# Altium PCB Nano_RP2040_Connect.PcbDoc (part 2 of 2)
Units mm, origin at the board's own origin, x right, y up, seen from the top; angles counter-clockwise.
Board outline 43.18 x 17.78 mm, 4 copper layers (TOP, GND, SIG, BOTTOM), stack 1.586 mm thick; 92 components, 78 nets, 388 pads, 198 vias.
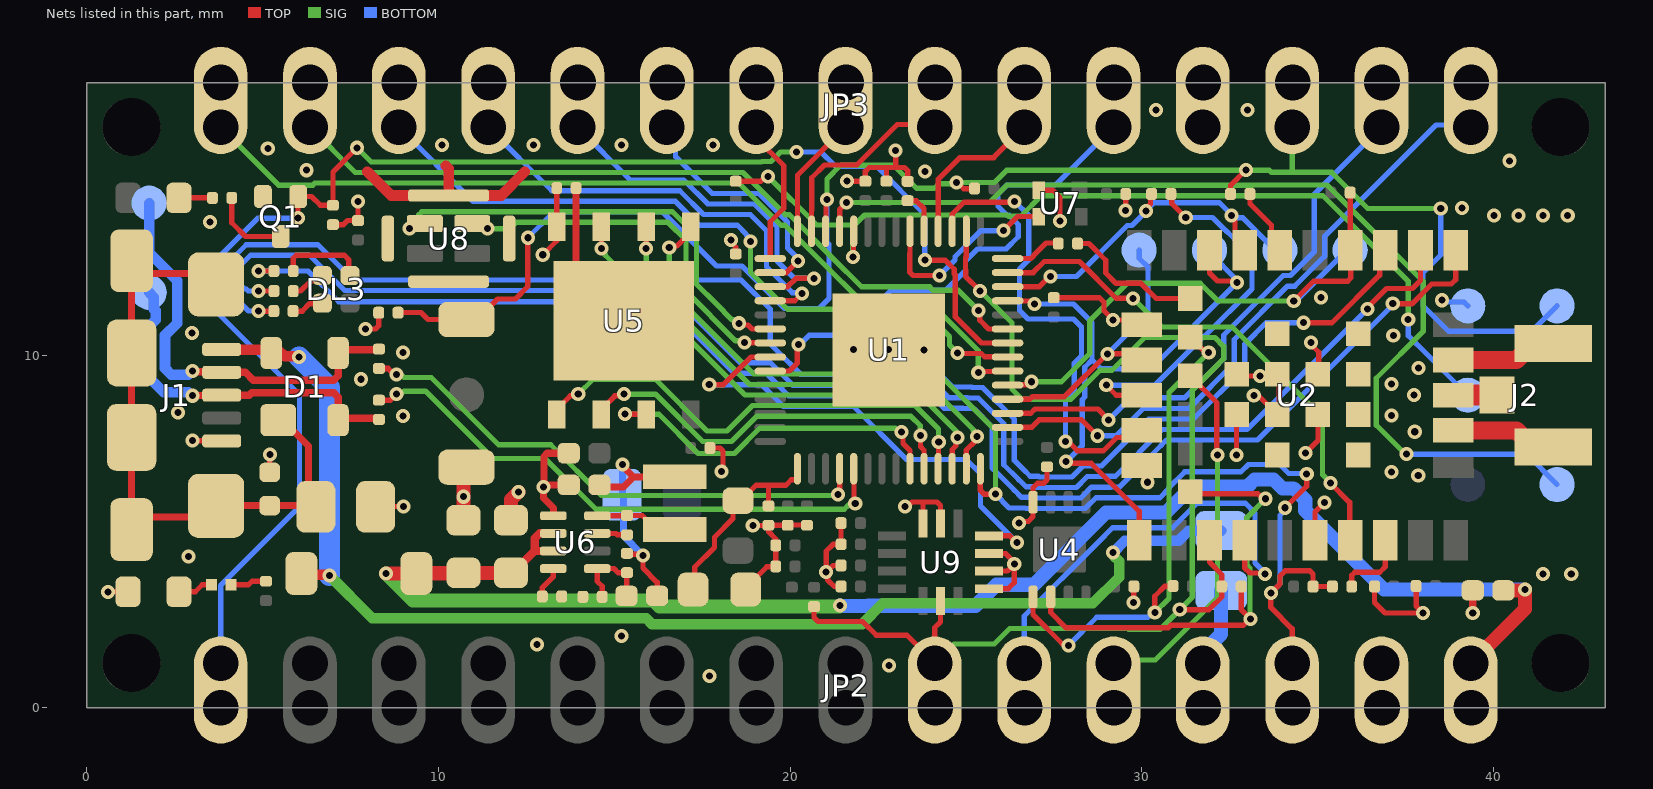
[diagram p4: the nets of this part, all layers, seen from the top]

## Via types
v1: diameter 0.4, hole 0.2, TOP to BOTTOM, tented both sides, 198 vias

## Nets (pads, with @x,y where several pads share a name; then routed paths per layer and width w, separated by ;. In a path a pad name is that pad's centre, name@x,y a point inside that pad or via, vN(x,y) a via of type N, cw(c..) or ccw(c..) an arc to the next point about the centre after c; other vN are vias at no path point) (continued)
A5/SCL~: JP2.9 R10.1 R17.1 U1.16 U2.3 U9.13 | length 37
  TOP w0.15: R10.1@20.676,2.871 20.676,2.563 20.792,2.447 22.055,2.447 22.446,2.055 23.315,2.055 JP2.9@24.109,1.261 24.109,2.271 24.269,2.431 U9.13@24.269,3.129 ; U1.16@25.004,13.541 25.004,12.817 24.981,12.794 24.981,12.442 24.987,12.436 24.987,12.257 v1(25.395,11.849) ; v1(31.074,2.784) 31.905,2.784 32.269,3.148 32.269,3.786 31.919,4.136 U2.3@31.919,4.756
  SIG w0.15: JP2.9@24.109,1.261 24.654,1.806 25.798,1.806 26.24,2.248 29.601,2.248 29.625,2.224 30.514,2.224 31.433,3.143 31.433,9.031 32.071,9.669 32.074,9.669 32.323,9.918 32.323,10.27 32.074,10.519 30.077,10.519 29.149,9.591 28.809,9.591 27.984,8.766 26.587,8.766 26.304,9.049 26.304,10.942 25.397,11.849 v1(25.395,11.849)
A6: JP2.10 U2.4 | length 12.6
  TOP w0.15: U2.4@32.919,4.756 32.919,3.973 33.068,3.824 33.46,3.824 v1(33.493,3.791)
  BOTTOM w0.15: JP2.10@26.649,1.261 26.649,2.596 28.733,4.68 29.169,5.116 30.874,5.116 31.57,5.812 32.934,5.812 33.212,5.534 33.212,4.112 33.493,3.831 v1(33.493,3.791)
A7: JP2.11 U2.34 | length 10.4
  TOP w0.15: U2.34@31.369,9.431 32.124,8.676 32.124,7.197 v1(32.142,7.18)
  SIG w0.15: JP2.11@29.189,1.261 29.281,1.353 30.376,1.353 32.144,3.121 32.144,7.177 v1(32.142,7.18)
ANT: J2.SIG U2.13 | length 1.3
  TOP w0.6: U2.13@38.844,8.881 J2.SIG@40.094,8.881
D2~: JP3.5 U1.37 | length 14.6
  TOP w0.15: U1.37@19.429,9.566 19.973,9.566 20.201,9.795 20.201,10.294 v1(20.234,10.326)
  BOTTOM w0.15: v1(20.234,10.326) 20.278,10.326 20.535,10.583 21.579,10.583 22.857,11.861 24.415,11.861 24.981,12.427 24.981,12.695 25.326,13.04 26.138,13.04 26.483,13.385 26.483,13.737 26.225,13.995 26.167,13.995 25.908,14.253 25.908,14.606 26.157,14.855 27.542,14.855 JP3.5@29.189,16.501
D3~: JP3.6 U1.18 | length 4.5
  TOP w0.15: U1.18@24.204,13.541 24.204,15.019 24.82,15.635 25.783,15.635 JP3.6@26.649,16.501
D4~: JP3.7 U1.27 | length 5.7
  TOP w0.15: U1.27@20.604,13.541 20.604,14.129 20.61,14.134 20.61,15.064 20.971,15.425 21.889,15.425 23.04,16.576 24.034,16.576 JP3.7@24.109,16.501
D5~: JP3.8 U1.28 | length 3.5
  TOP w0.15: U1.28@20.204,13.541 20.204,14.331 20.207,14.334 20.207,14.766 20.204,14.769 20.204,15.136 JP3.8@21.569,16.501
D6~: JP3.9 U1.29 | length 4.2
  TOP w0.15: JP3.9@19.029,16.501 19.029,16.193 19.813,15.409 19.813,14.195 19.429,13.812 U1.29@19.429,12.766
D7~: JP3.10 U1.30 | length 7.1
  TOP w0.15: U1.30@19.429,12.366 19.894,12.366 v1(20.224,12.696)
  BOTTOM w0.15: JP3.10@16.489,16.501 16.734,16.257 16.734,15.664 17.782,14.616 19.11,14.616 19.921,13.806 19.921,13.07 20.109,12.882 20.109,12.879 20.224,12.764 v1(20.224,12.696)
D8~: JP3.11 U1.31 | length 10.4
  TOP w0.15: U1.31@19.429,11.966 19.926,11.966 20.162,12.202 v1(20.679,12.202)
  BOTTOM w0.15: JP3.11@13.949,16.501 15.457,14.993 16.98,14.993 17.657,14.316 18.986,14.316 19.621,13.681 19.621,12.697 20.104,12.215 20.666,12.215 v1(20.679,12.202)
D9~: JP3.12 U1.32 | length 12.5
  TOP w0.15: U1.32@19.439,11.576 U1.32@19.429,11.566 20.127,11.566 v1(20.334,11.773)
  BOTTOM w0.15: JP3.12@11.409,16.501 13.217,14.693 16.856,14.693 17.533,14.016 18.862,14.016 19.321,13.557 19.321,12.532 20.059,11.794 20.312,11.794 v1(20.334,11.773)
D10~: JP3.13 U1.7 | length 20.7
  TOP w0.15: v1(24.754,10.086) 24.774,10.066 25.431,10.066 25.521,9.976 26.17,9.976 U1.7@26.179,9.966
  SIG w0.15: v1(18.87,13.253) 18.87,12.377 19.921,11.327 23.749,11.327 24.529,10.546 24.529,10.311 v1(24.754,10.086)
  BOTTOM w0.15: JP3.13@8.869,16.501 10.977,14.393 16.732,14.393 17.409,13.716 18.491,13.716 18.74,13.468 18.74,13.451 18.87,13.32 v1(18.87,13.253)
D_N: R4.2 U1.46 | length 15.3
  TOP w0.15: v1(21.357,6.063) 21.404,6.111 U1.46@21.404,6.791
  TOP w0.16: R4.2@8.304,9.641 8.564,9.641 8.739,9.466 v1(8.804,9.466)
  SIG w0.15: v1(8.804,9.466) 8.852,9.419 8.985,9.419 9.017,9.386 9.793,9.386 11.706,7.473 13.191,7.473 14.637,6.028 21.322,6.028 v1(21.357,6.063)
D_P: R5.2 U1.47 | length 16.1
  TOP w0.15: U1.47@21.804,6.791 21.814,6.782 21.814,5.831 v1(21.847,5.798)
  TOP w0.16: R5.2@8.304,8.741 8.629,8.741 v1(8.804,8.916)
  SIG w0.15: v1(8.804,8.916) 8.852,8.964 8.985,8.964 9.017,8.996 9.632,8.996 11.545,7.083 13.03,7.083 14.475,5.638 21.533,5.638 21.645,5.75 21.799,5.75 v1(21.847,5.798)
GND: C1.1 C2.2 C3.1 C4.1 C5.2 C6.2 C7.2 C8.2 C9.1 C10.2 C11.2 C12.2 C13.2 C14.2 C15.2 C16.2 C17.1 C18.2 C21.2 C22.1 C23.1 C24.2 C25.1 C26.2 C27.2 C28.2 C30.2 C32.2 C33.1 DL1.C J1.5 J2.GND JP2.14 JP3.4 PB1.1 Q1.S R1.1 R3.2 R8.1 R23.1 RPAD.2 TP_GND.X U1.57 U2.6 U2.12 U2.14 U2.26 U2.30 U2.GND1 U2.GND2 U2.GND3 U2.GND4 U2.GND5 U2.GND6 U2.GND7 U2.GND8 U2.GND9 U2.GND10 U2.GND11 U2.GND12 U4.4 U5.4 U6.1 U7.2 U8.5 U9.1 U9.2 U9.3 U9.6 U9.7 | length 60.6
  TOP w0.15: v1(0.604,3.291) DL1.C@1.169,3.291 ; v1(3.004,7.591) 3.009,7.586 3.829,7.586 J1.5@3.834,7.581 ; R1.1@5.201,6.689 5.203,6.691 5.203,7.19 v1(5.204,7.191) ; R23.1@6.996,13.731 7.299,13.731 7.414,13.846 C28.2@7.711,13.846 v1(7.711,14.392) ; v1(7.921,10.762) 8.202,10.762 8.298,10.857 C2.2@8.298,11.226 ; C1.1@8.21,5.706 8.22,5.716 v1(9.004,5.716) ; v1(12.962,12.875) 12.965,12.875 13.361,13.271 RPAD.2@13.361,14.771 ; C26.2@17.721,7.381 17.999,7.381 18.086,7.293 18.086,6.759 v1(18.04,6.712) ; v1(18.315,13.291) 18.315,13.224 18.45,13.088 C21.2@18.45,12.9 ; C9.1@18.735,3.355 18.735,3.405 19.33,4.001 19.574,4.001 C24.2@19.587,4.014 C33.1@19.587,4.614 19.587,4.795 19.38,5.002 C8.2@19.38,5.182 ; v1(18.934,5.173) 18.939,5.178 19.375,5.178 C8.2@19.38,5.182 ; C13.2@20.476,5.182 20.467,5.191 19.937,5.191 C18.2@19.928,5.182 19.923,5.187 19.384,5.187 C8.2@19.38,5.182 ; v1(21.015,3.851) 21.063,3.803 21.063,3.629 21.25,3.443 C32.2@21.445,3.443 ; C30.2@21.445,4.043 21.443,4.041 21.214,4.041 21.046,3.873 21.038,3.873 21.023,3.887 21.023,4.449 21.215,4.641 21.442,4.641 C6.2@21.445,4.643 ; C6.2@21.445,4.651 C5.2@21.445,5.243 ; v1(21.611,14.966) C10.2@22.134,14.966 22.134,15.246 22.246,15.358 22.748,15.358 ; C11.2@22.734,14.966 22.734,15.343 22.748,15.358 ; v1(22.994,15.843) 22.999,15.839 22.999,15.358 ; v1(23.267,5.719) 23.335,5.719 23.461,5.845 23.771,5.845 ; R3.2@23.338,14.962 23.338,15.27 23.25,15.358 22.999,15.358 ; U9.7@23.771,5.331 23.771,5.845 ; U9.6@24.271,5.331 24.271,5.74 24.166,5.845 23.771,5.845 ; U9.1@25.646,3.381 26.198,3.381 26.369,3.552 v1(26.369,4.079) ; U9.2@25.646,3.881 26.171,3.881 v1(26.369,4.079) ; U9.3@25.646,4.381 26.123,4.381 26.369,4.135 v1(26.369,4.079) ; v1(26.503,5.252) 26.543,5.291 26.766,5.291 26.904,5.429 U4.4@26.904,5.836 ; U4.4@26.869,5.916 26.904,5.952 26.904,6.25 27.036,6.381 27.211,6.381 27.299,6.469 C12.2@27.299,6.847 ; U7.2@27.067,14.708 27.467,14.708 27.672,14.503 v1(27.672,13.833) ; C7.2@27.491,11.654 28.305,11.654 28.786,11.654 28.917,11.523 28.917,11.281 v1(29.177,11.021) 29.855,11.021 U2.26@29.994,10.881 ; v1(29.536,14.129) 29.538,14.131 29.538,14.59 C14.2@29.539,14.591 ; v1(29.763,2.993) 29.766,2.996 29.766,3.439 C27.2@29.769,3.442 ; U2.30@29.994,6.881 30.151,6.724 v1(30.151,6.407) ; v1(32.692,7.18) 32.69,7.182 32.69,8.322 U2.GND11@32.699,8.332 ; U2.GND12@32.699,9.481 32.752,9.429 v1(33.357,9.429) ; v1(33.178,8.871) 33.226,8.824 33.357,8.824 U2.GND8@33.849,8.332 33.904,8.387 33.904,9.426 U2.GND9@33.849,9.481 ; v1(34.654,7.241) 35.004,7.591 35.004,8.327 U2.GND5@34.999,8.332 ; v1(34.81,10.386) 34.81,10.318 35.025,10.103 35.025,9.507 U2.GND6@34.999,9.481 ; U2.6@34.919,4.756 34.919,5.557 v1(35.193,5.83) ; C15.2@36.613,3.442 36.613,2.987 36.909,2.691 v1(37.984,2.691) 37.984,2.7 37.794,2.89 C16.2@37.794,3.453 ; 22.748,15.358 22.999,15.358
  TOP w0.2: v1@12.996,6.243 12.996,7.143 13.084,7.231 C17.1@13.701,7.231 ; U6.1@13.263,5.451 13.263,5.676 12.98,5.959 v1(12.98,6.266) 13.034,6.266 13.099,6.331 C3.1@13.701,6.331 ; v1(39.404,2.691) C25.1@39.404,3.291
  TOP w0.3: 7.978,15.231 8.65,14.559 U8.5@10.284,14.559 ; 10.2,15.4 10.284,15.316 U8.5@10.284,14.559 ; 12.45,15.231 11.778,14.559 U8.5@10.284,14.559
  TOP w0.4: C23.1@10.708,5.328 v1(10.708,5.995) 10.708,6.747 PB1.1@10.794,6.833 ; C4.1@12.058,5.328 12.058,5.918 v1(12.271,6.131)
  TOP w0.508: U2.12@38.844,7.881 40.644,7.881 41.119,7.406 J2.GND@41.694,7.406 ; U2.14@38.844,9.881 40.644,9.881 41.119,10.356 J2.GND@41.694,10.356
  BOTTOM w0.15: v1(38.526,11.581) 38.574,11.534 39.151,11.534 TP_GND.X@39.263,11.421
  other v1: 17.704,0.891 22.804,1.191 12.804,1.791 15.204,2.039 41.404,3.791 42.204,3.791 2.894,4.296 37.854,6.601 37.1,6.7 37.755,7.842 8.994,8.291 37.1,8.3 2.594,8.391 37.729,8.891 37.1,9.2 7.794,9.335 37.862,9.658 8.994,10.091 21.795,10.176 22.795,10.176 23.804,10.166 37.144,10.581 2.993,10.645 35.093,11.653 3.5,13.8 40.004,13.991 40.704,13.991 41.404,13.991 42.104,13.991 39.1,14.2 23.835,15.245 6.244,15.278 40.454,15.546 5.144,15.896 10.1,16 12.7,16 15.2,16 17.8,16 30.404,16.991 33.004,16.991
GPIO0: TP_GPIO0.X U1.4 U2.27 | length 8
  TOP w0.15: U1.4@26.179,8.766 26.814,8.766 26.887,8.839 27.795,8.839 v1(29.014,10.057) 29.819,10.057 U2.27@29.994,9.881
  BOTTOM w0.15: v1(29.014,10.057) 30.174,11.217 30.174,12.522 29.919,12.776 TP_GPIO0.X@29.919,13.006
INT1: U1.36 U9.4 | length 14.1
  TOP w0.15: v1(17.696,9.181) 18.101,9.181 18.887,9.966 U1.36@19.429,9.966 ; U9.4@25.646,4.881 26.244,4.881 26.433,4.693 v1(26.445,4.693)
  BOTTOM w0.15: v1(17.696,9.181) 19.185,9.181 19.8,8.567 21.789,8.567 23.301,7.056 25.004,7.056 25.409,6.651 25.409,5.729 v1(26.445,4.693)
LEDB: R13.2 U2.17 | length 42
  TOP w0.15: v1(4.878,11.841) R13.2@5.319,11.841 ; v1(36.411,11.332) 36.411,11.371 36.954,11.914 37.686,11.914 37.919,12.147 U2.17@37.919,13.006
  BOTTOM w0.15: v1(4.878,11.841) 4.591,11.841 4.533,11.9 4.482,11.9 4.346,12.036 4.346,12.551 4.655,12.859 6.329,12.859 7.331,11.857 16.523,11.857 18.573,9.807 19.43,9.807 20.071,9.167 24.14,9.167 24.494,8.812 25.033,8.812 25.045,8.8 25.345,8.8 26.071,8.074 26.071,6.904 26.496,6.479 ; 26.497,6.479 26.699,6.277 26.928,6.277 26.947,6.257 28.135,6.257 28.445,6.566 28.978,6.566 28.984,6.573 29.24,6.573 30.571,7.905 32.984,7.905 v1(36.411,11.332)
LEDG: R14.2 U2.16 | length 41.2
  TOP w0.15: v1(4.878,12.412) R14.2@5.319,12.412 ; v1(37.13,11.489) 37.14,11.479 37.675,11.479 38.238,12.041 38.794,12.041 38.919,12.166 U2.16@38.919,13.006
  BOTTOM w0.15: v1(4.878,12.412) 6.242,12.412 ; 6.292,12.412 7.164,11.54 16.365,11.54 18.399,9.507 19.306,9.507 19.947,8.867 24.015,8.867 24.37,8.512 24.909,8.512 24.921,8.5 25.22,8.5 25.736,7.985 25.736,6.816 25.771,6.781 ; 25.771,6.78 26.372,6.179 ; 26.373,6.179 26.575,5.977 26.804,5.977 26.823,5.957 28.26,5.957 28.569,6.266 29.102,6.266 29.109,6.273 29.364,6.273 30.548,7.457 30.696,7.605 33.285,7.605 37.13,11.449 v1(37.13,11.489)
LEDR: R15.2 U2.18 | length 42.8
  TOP w0.15: v1(4.874,11.271) R15.2@5.316,11.271 ; v1(34.594,10.942) 35.405,10.942 36.757,12.294 36.757,12.844 U2.18@36.919,13.006
  BOTTOM w0.15: v1(4.874,11.271) 4.869,11.277 4.599,11.277 4.019,11.857 4.019,12.647 4.531,13.159 6.572,13.159 7.574,12.157 18.603,12.157 19.429,11.33 19.429,10.337 19.63,10.137 20.3,9.467 24.264,9.467 24.619,9.112 25.157,9.112 25.169,9.1 25.469,9.1 26.371,8.198 26.371,7.028 26.62,6.779 ; 26.621,6.779 26.824,6.577 27.052,6.577 27.072,6.557 28.011,6.557 28.32,6.866 28.853,6.866 30.192,8.205 31.458,8.205 32.924,9.671 32.924,10.335 33.531,10.941 v1(34.594,10.942)
NetC1_2: C1.2 D1.1 J1.M1 J1.M2 J1.M3 J1.M4 J1.M5 J1.M6 R1.2 | length 18.9
  TOP w0.2: J1.M1@3.674,12.029 3.364,12.339 1.636,12.339 J1.M2@1.274,12.701 J1.M3@1.274,5.061 1.636,5.423 3.364,5.423 3.68,5.739 6.477,5.739 C1.2@6.51,5.706 6.305,5.912 6.305,7.439 5.492,8.251 D1.1@5.442,8.251
NetC3_2: C3.2 C20.2 L2.2 R6.2 SJ4.2 | length 7.4
  TOP w0.15: v1@15.227,6.877 v1(15.227,6.905) ; R6.2@15.358,4.384 15.386,4.356 15.782,4.356 v1(15.81,4.329) 15.81,3.965 16.215,3.561 C20.2@16.215,3.176
  TOP w0.2: C3.2@14.571,6.331 14.627,6.275 15.26,6.275 15.544,6.559 ; v1@15.227,6.877 15.544,6.559 ; L2.2@16.771,6.531 16.743,6.559 15.544,6.559
  BOTTOM w0.2: v1(15.227,6.905) 15.227,6.058 SJ4.2@15.221,6.052 15.255,6.019 15.255,4.884 v1(15.81,4.329)
NetC8_1: C8.1 C9.2 L1.1 U1.43 | length 5.9
  TOP w0.15: C9.2@17.235,3.355 17.283,3.403 17.283,3.994 17.843,4.555 17.843,4.844 18.371,5.371 18.371,5.713 18.551,5.894 18.603,5.894 19.03,6.32 19.39,6.32 ; C8.1@19.38,5.702 19.38,6.309 19.39,6.32 ; U1.43@20.204,6.791 20.204,6.499 20.181,6.476 20.029,6.476 19.874,6.32 19.39,6.32
NetC19_1: C19.1 L2.1 U6.8 | length 2.4
  TOP w0.15: U6.8@14.513,5.451 14.518,5.456 15.353,5.456 C19.1@15.358,5.461 15.791,5.461 16.221,5.031 L2.1@16.771,5.031
NetC19_2: C19.2 U6.7 | length 0.9
  TOP w0.15: U6.7@14.513,4.951 15.043,4.951 15.083,4.911 C19.2@15.358,4.911
NetC20_1: C20.1 R6.1 R8.2 U6.5 | length 2.4
  TOP w0.15: R8.2@14.652,3.149 14.652,3.45 14.513,3.59 U6.5@14.513,3.951 14.99,3.951 15.106,3.834 R6.1@15.358,3.834 15.351,3.828 15.351,3.183 C20.1@15.345,3.176
NetC22_2: C22.2 U6.4 | length 0.9
  TOP w0.15: C22.2@12.95,3.16 12.95,3.41 13.263,3.723 U6.4@13.263,3.951
NetDL1_A: DL1.A SJ2.1 | length 1
  TOP w0.15: DL1.A@2.619,3.291 3.081,3.291 3.281,3.491 SJ2.1@3.544,3.491
NetDL2_C: DL2.C R25.1 | length 0.9
  TOP w0.15: DL2.C@2.619,14.491 R25.1@3.569,14.491
NetDL3_2: DL3.2 R15.1 | length 0.8
  TOP w0.15: R15.1@5.916,11.271 6.123,11.271 6.336,11.484 6.632,11.484 DL3.2@6.644,11.496
NetDL3_3: DL3.3 R13.1 | length 1
  TOP w0.15: R13.1@5.919,11.841 6.077,11.841 6.367,12.132 6.54,12.132 DL3.3@6.694,12.286
NetDL3_4: DL3.4 R14.1 | length 2.5
  TOP w0.15: R14.1@5.869,12.412 5.866,12.415 5.866,12.771 5.954,12.859 7.327,12.859 7.444,12.741 DL3.4@7.444,12.296
NetJP2_12: JP2.12 SJ1.2 | length 2.3
  BOTTOM w0.4: JP2.12@31.729,1.261 31.729,1.566 32.252,2.089 SJ1.2@32.252,3.332
NetQ1_D: Q1.D R25.2 | length 2.3
  TOP w0.15: R25.2@4.119,14.491 4.119,13.783 4.511,13.391 Q1.D@5.508,13.391
NetR2_1: R2.1 SJ2.2 | length 1
  TOP w0.15: SJ2.2@4.144,3.491 4.599,3.491 4.702,3.594 5.091,3.594 R2.1@5.094,3.591
NetR3_1: R3.1 U1.19 | length 1.2
  TOP w0.15: R3.1@23.338,14.412 23.58,14.412 23.804,14.187 U1.19@23.804,13.541
NetR18_2: R18.2 U2.36 | length 4.1
  TOP w0.15: R18.2@28.169,13.191 28.494,13.191 28.969,12.717 28.969,12.357 29.265,12.061 29.975,12.061 30.404,11.632 U2.36@31.369,11.632
NetR20_1: R20.1 U2.8 | length 2.1
  TOP w0.15: R20.1@35.963,3.442 35.963,3.758 36.051,3.846 36.759,3.846 36.919,4.006 U2.8@36.919,4.756
NetR22_1: R22.1 U2.28 | length 10.7
  TOP w0.15: v1@28.964,9.145 v1(28.985,9.166) 29.269,8.881 U2.28@29.994,8.881 ; R22.1@30.821,14.587 R22.1@30.821,14.708 ; R22.1@30.821,14.59 R22.1@30.821,14.602 30.845,14.578 30.845,14.33 v1(31.244,13.931)
  BOTTOM w0.15: v1(28.985,9.166) 30.368,9.166 31.762,10.56 31.784,10.56 33.129,11.905 33.129,12.807 32.437,13.513 ccw(c31.919,13.006) 32.342,13.595 32.004,13.931 v1(31.244,13.931)
NetR28_1: R28.1 U2.21 | length 1.9
  TOP w0.15: R28.1@33.069,14.602 33.069,14.324 33.681,13.712 33.681,13.244 U2.21@33.919,13.006
NetRPAD_1: RPAD.1 U5.9 | length 4.3
  TOP w0.2: RPAD.1@13.911,14.771 13.911,12.356 U5.9@15.266,11.001
NetU1_20: U1.20 U7.3 | length 5.6
  TOP w0.15: U1.20@23.404,13.541 23.404,12.91 23.399,12.905 23.399,12.374 23.487,12.286 v1(24.239,12.286) ; v1(26.058,13.561) 26.459,13.962 27.063,13.962 U7.3@27.067,13.958
  BOTTOM w0.15: v1(24.239,12.286) 24.681,12.728 24.681,12.819 25.423,13.561 v1(26.058,13.561)
PDMCLK: U1.35 U8.3 | length 10.9
  TOP w0.15: U8.3@10.959,13.759 11.242,13.759 v1(11.387,13.615) ; v1(18.697,10.378) 18.702,10.372 19.423,10.372 U1.35@19.429,10.366
  SIG w0.15: v1(11.387,13.615) 12.024,13.615 12.205,13.796 16.526,13.796 17.034,13.288 17.034,11.839 18.447,10.426 18.649,10.426 v1(18.697,10.378)
PDMDIN: U1.34 U8.4 | length 13.2
  TOP w0.15: v1(9.177,13.616) 9.466,13.616 U8.4@9.609,13.759 ; v1(18.548,10.926) 18.596,10.878 18.798,10.878 18.909,10.766 U1.34@19.429,10.766
  SIG w0.15: v1(9.177,13.616) 9.437,13.876 9.437,14.008 9.525,14.096 16.65,14.096 17.334,13.412 17.334,12.035 17.883,11.485 18.345,11.024 18.382,11.024 18.48,10.926 v1(18.548,10.926)
QSPI_CSn: JP2.13 R19.1 R20.2 U1.56 U5.1 | length 34.2
  TOP w0.15: v1(16.559,13.077) 16.606,13.125 16.775,13.125 17.172,13.521 U5.1@17.171,13.671 ; U1.56@25.404,6.791 25.404,6.173 25.511,6.067 v1(25.834,6.067) ; v1(34.071,5.682) 34.684,6.294 v1(34.684,6.644) ; JP2.13@34.269,1.261 34.269,2.237 33.664,2.842 v1(33.664,3.254) 33.924,3.514 33.924,3.739 34.072,3.887 34.775,3.887 34.863,3.799 R19.1@34.863,3.442 R20.2@35.413,3.442
  SIG w0.15: v1(16.559,13.077) 16.559,11.89 18.963,9.486 24.222,9.486 25.736,7.972 25.834,7.875 v1(25.834,6.067)
  BOTTOM w0.15: v1(25.834,6.067) 26.224,5.677 26.679,5.677 26.699,5.657 28.384,5.657 28.693,5.966 30.509,5.966 30.758,6.215 30.758,6.244 31.217,6.704 32.816,6.704 33.025,6.912 33.916,6.912 34.171,6.657 34.671,6.657 v1(34.684,6.644) ; v1(33.664,3.254) 33.924,3.515 33.924,5.469 34.071,5.616 v1(34.071,5.682)
QSPI_SCK: U1.52 U5.6 | length 11.6
  TOP w0.15: U5.6@14.631,8.331 14.631,8.481 15.013,8.863 15.223,8.863 v1(15.271,8.911) ; v1(23.702,7.741) 23.702,7.418 23.804,7.316 U1.52@23.804,6.791
  SIG w0.15: v1(15.271,8.911) 16.167,8.911 17.513,7.565 18.327,7.565 19.042,8.28 23.43,8.28 23.694,8.016 23.694,7.749 v1(23.702,7.741)
QSPI_SD0: U1.53 U5.5 | length 13.7
  TOP w0.15: U5.5@13.361,8.331 13.362,8.481 13.743,8.863 13.924,8.863 v1(13.972,8.911) ; U1.53@24.204,6.791 24.213,6.8 24.213,7.547 v1(24.222,7.556)
  SIG w0.15: v1(13.972,8.911) 14.397,9.336 16.166,9.336 17.637,7.865 18.202,7.865 18.924,8.586 23.548,8.586 24.213,7.921 24.213,7.564 v1(24.222,7.556)
QSPI_SD1: U1.55 U5.2 | length 13.9
  TOP w0.15: v1(15.902,13.051) U5.2@15.901,13.671 ; U1.55@25.004,6.791 25.004,7.32 25.263,7.578 25.263,7.662 v1(25.311,7.71)
  SIG w0.15: v1(15.902,13.051) 15.902,12.123 18.839,9.186 23.921,9.186 25.203,7.904 25.203,7.885 25.311,7.778 v1(25.311,7.71)
QSPI_SD2: U1.54 U5.3 | length 14.1
  TOP w0.15: v1(14.632,13.051) U5.3@14.631,13.671 ; U1.54@24.604,6.791 24.604,7.337 24.704,7.437 24.704,7.444 24.711,7.45 24.711,7.627 v1(24.759,7.675)
  SIG w0.15: v1(14.632,13.051) 14.632,12.983 14.741,12.874 14.741,12.859 18.714,8.886 23.693,8.886 24.711,7.868 24.711,7.723 v1(24.759,7.675)
QSPI_SD3: U1.51 U5.7 | length 10.4
  TOP w0.15: v1(15.296,8.342) 15.884,8.342 U5.7@15.898,8.328 ; v1(23.16,7.833) 23.208,7.785 23.208,7.507 23.404,7.311 U1.51@23.404,6.791
  SIG w0.15: v1(15.296,8.342) 16.26,8.342 17.377,7.226 18.412,7.226 19.129,7.943 22.983,7.943 23.092,7.833 v1(23.16,7.833)
RESETN: C2.1 JP3.3 PB1.2 R12.1 R28.2 TP_RESETN.X U1.26 | length 48.8
  TOP w0.15: C2.1@8.836,11.234 9.504,11.234 9.705,11.033 PB1.2@10.794,11.033 11.094,11.033 11.676,11.615 12.183,11.615 12.537,11.969 v1(12.537,13.357) ; U1.26@21.004,13.541 21.014,13.551 21.014,14.409 v1(21.045,14.44) ; v1(24.722,14.93) 24.755,14.93 24.933,14.753 R12.1@25.297,14.753 ; R28.2@32.519,14.602 32.519,14.847 32.951,15.279 v1(32.961,15.279)
  SIG w0.15: v1(21.045,14.44) 21.045,15.031 21.432,15.418 22.94,15.418 23.592,14.766 24.092,14.766 24.222,14.896 24.687,14.896 v1(24.722,14.93) 25.809,14.93 26.158,15.279 33.618,15.279 33.681,15.216 34.269,15.216 ; JP3.3@34.269,16.501 34.269,15.216 ; v1(38.494,14.191) 36.42,14.191 35.395,15.216 34.269,15.216
  BOTTOM w0.15: v1(12.537,13.357) 13.273,14.093 16.363,14.093 17.902,12.554 18.629,12.554 19.836,11.348 20.817,11.348 21.104,11.635 21.104,13.17 21.045,13.229 v1(21.045,14.44) ; v1(38.494,14.191) 38.494,12.871 37.992,12.368 37.992,11.426 38.721,10.696 41.078,10.696 TP_RESETN.X@41.803,11.421
RSTN_NINA: R7.1 TP_RST.X U1.5 U2.19 | length 16.6
  TOP w0.15: U1.5@26.179,9.166 26.189,9.176 26.707,9.176 26.795,9.264 v1(26.862,9.264) ; v1(34.315,11.556) 34.881,12.123 35.847,12.123 35.935,12.211 U2.19@35.935,13.006 ; U2.19@35.919,13.006 R7.1@35.919,14.639
  SIG w0.15: v1(26.862,9.264) 27.708,9.264 28.518,10.074 28.518,11.006 29.573,12.061 31.658,12.061 32.162,11.556 v1(34.315,11.556)
  BOTTOM w0.15: v1(34.315,11.556) 34.383,11.556 35.833,13.006 TP_RST.X@35.919,13.006
RX: JP3.2 U1.3 | length 15.6
  TOP w0.15: U1.3@26.179,8.366 26.839,8.366 26.958,8.486 28.744,8.486 v1(29.049,8.181)
  BOTTOM w0.15: v1(29.049,8.181) 29.673,8.805 31.209,8.805 32.324,9.92 32.324,10.591 34.015,12.281 34.22,12.281 34.894,12.956 34.894,14.586 JP3.2@36.809,16.501
SCL_CRYPTO: R17.2 U2.31 U4.6 | length 13.3
  TOP w0.15: U4.6@27.404,3.146 27.404,2.703 27.842,2.265 30.747,2.265 30.818,2.336 32.879,2.336 33.066,2.524 33.066,2.538 32.819,2.785 R17.2@32.819,3.442 ; U2.31@31.369,6.131 31.421,6.08 33.301,6.08 33.444,5.937 v1(33.512,5.937)
  SIG w0.15: v1(33.08,2.524) 33.068,2.536 33.068,3.962 32.981,4.049 32.981,5.406 v1(33.512,5.937)
SDA_CRYPTO: R16.2 U2.35 U4.5 | length 14.6
  TOP w0.15: U4.5@26.904,3.146 26.904,2.644 27.733,1.816 27.867,1.816 v1(27.915,1.768) ; v1(30.364,2.698) 30.364,3.166 30.65,3.453 R16.2@30.88,3.453 ; U2.35@31.369,10.531 31.758,10.142 31.85,10.142 v1(31.898,10.094)
  SIG w0.15: v1(30.364,2.698) 30.765,3.099 30.765,8.962 v1(31.898,10.094)
  BOTTOM w0.15: v1(27.915,1.768) 28.714,2.568 30.166,2.568 30.296,2.698 v1(30.364,2.698)
SPI1_ACK/UART1_CTS: U1.13 U2.7 | length 14.7
  TOP w0.15: U1.13@26.179,12.366 26.906,12.366 27.221,12.681 28.221,12.681 29.266,11.636 v1(29.749,11.636) ; v1(35.354,6.385) 35.904,5.834 35.904,4.771 U2.7@35.919,4.756
  SIG w0.15: v1(29.749,11.636) 30.565,10.819 32.568,10.819 35.131,8.256 35.131,6.622 35.354,6.4 v1(35.354,6.385)
SPI1_CIPO/UART1_TX: TP_TX.X U1.11 U2.1 U2.23 | length 18.4
  TOP w0.15: U1.11@26.179,11.566 26.189,11.557 26.786,11.557 26.872,11.472 v1(26.939,11.472) ; v1(27.844,6.991) 27.892,6.944 28.557,6.944 29.919,5.581 U2.1@29.919,4.756 ; U2.23@31.919,13.006 31.919,12.357 32.147,12.129 32.656,12.129 v1(32.704,12.081)
  BOTTOM w0.15: v1(26.939,11.472) 28.054,11.472 28.577,10.948 28.577,9.879 28.373,9.675 28.373,8.83 28.305,8.762 28.305,7.447 27.849,6.991 v1(27.844,6.991) ; 28.594,9.875 28.838,9.632 30.255,9.632 v1(32.704,12.081) 32.704,12.149 31.919,12.934 TP_TX.X@31.919,13.006
SPI1_COPI/UART1_RTS: R18.1 U1.14 | length 1.6
  TOP w0.15: U1.14@26.179,12.766 26.843,12.766 26.931,12.854 26.931,12.864 27.275,13.208 27.603,13.208 R18.1@27.619,13.191
SPI1_CS/UART1_RX: R22.2 TP_RX.X U1.12 U2.22 | length 11
  TOP w0.15: U1.12@26.179,11.966 27.086,11.966 27.375,12.256 v1(27.397,12.256) ; v1(30.115,14.124) 30.115,14.191 30.241,14.318 30.241,14.586 R22.2@30.271,14.616 ; v1(32.542,13.996) 32.542,13.928 32.644,13.826 32.644,13.281 U2.22@32.919,13.006
  BOTTOM w0.15: v1(27.397,12.256) 28.133,12.256 29.582,13.704 29.712,13.704 30.115,14.107 v1(30.115,14.124) 30.347,14.356 32.196,14.356 32.542,14.01 v1(32.542,13.996) ; v1@32.554,14.003 v1@32.621,13.918 ; v1@32.673,13.929 32.861,13.929 33.783,13.006 TP_RX.X@33.919,13.006
SPI1_SCK: U1.17 U2.29 | length 13.7
  TOP w0.15: U1.17@24.604,13.541 24.604,14.03 24.941,14.367 26.35,14.367 v1(26.378,14.394) ; v1(27.827,7.57) 27.894,7.57 28.161,7.303 28.906,7.303 29.282,7.679 29.792,7.679 U2.29@29.994,7.881
  BOTTOM w0.15: v1(26.378,14.394) 26.783,13.989 26.783,12.738 26.514,12.469 26.514,11.296 26.763,11.047 28.054,11.047 28.277,10.824 28.277,10.003 28.073,9.799 28.073,8.954 27.827,8.709 v1(27.827,7.57)
SPICLK~: JP2.1 Q1.G R23.2 U1.8 | length 42.3
  TOP w0.15: v1(5.998,13.916) 6.003,13.92 6.003,14.527 Q1.G@6.008,14.531 6.39,14.531 6.64,14.281 R23.2@6.996,14.281 6.996,15.229 v1(7.684,15.916) ; v1(23.824,12.729) 23.831,12.722 24.404,12.722 24.664,12.462 24.664,12.335 24.687,12.312 24.687,11.115 25.436,10.366 U1.8@26.179,10.366
  SIG w0.15: v1(7.684,15.916) 8.085,15.514 19.183,15.514 19.196,15.528 19.451,15.528 19.721,15.797 v1(20.181,15.797)
  BOTTOM w0.15: JP2.1@3.804,1.261 3.804,3.471 6.049,5.716 6.049,8.895 3.719,11.226 3.719,12.771 4.863,13.916 v1(5.998,13.916) ; v1(20.181,15.797) 20.878,15.797 21.284,15.391 22.447,15.391 23.824,14.013 v1(23.824,12.729)
SPIRX~: JP3.15 U1.6 | length 25.7
  TOP w0.15: v1(25.345,9.525) 25.377,9.557 26.17,9.557 U1.6@26.179,9.566 U1.6@26.17,9.576
  SIG w0.15: JP3.15@3.804,16.501 5.453,14.853 6.42,14.853 6.482,14.914 18.535,14.914 19.736,13.713 19.852,13.713 21.478,12.087 21.481,12.087 21.907,11.661 23.839,11.661 25.345,10.154 v1(25.345,9.525)
SPITX~: JP3.14 U1.9 | length 22.4
  TOP w0.15: v1(25.355,11.29) 25.387,11.258 25.387,11.015 25.636,10.766 U1.9@26.179,10.766
  SIG w0.15: JP3.14@6.344,16.501 7.631,15.214 18.659,15.214 19.86,14.013 19.977,14.013 21.603,12.387 21.605,12.387 22.031,11.961 23.963,11.961 24.063,11.861 24.782,11.861 25.353,11.29 v1(25.355,11.29)
SWCLK: R11.1 TP_SWCLK.X U1.24 | length 26.7
  TOP w0.15: R11.1@18.45,14.966 19.168,14.966 19.304,15.103 v1(19.372,15.103) ; v1(21.779,12.812) 21.795,12.828 21.795,13.532 U1.24@21.804,13.541
  SIG w0.15: v1(19.372,15.103) 20.753,13.722 21.828,13.722 ; v1(21.779,12.812) 21.779,13.263 21.828,13.312 21.828,13.722 ; v1(37.569,11.032) 37.574,11.037 37.574,12.119 35.138,14.554 33.262,14.554 30.2,14.554 27.139,14.554 26.554,13.969 26.202,13.969 26.167,14.004 22.11,14.004 21.828,13.722
  BOTTOM w0.15: v1(37.569,11.032) 37.569,10.575 37.801,10.343 TP_SWCLK.X@39.263,8.881
SWDIO: TP_SWDIO.X U1.25 | length 29.1
  TOP w0.15: U1.25@21.404,13.541 21.404,14.161 v1(21.602,14.359)
  SIG w0.15: v1(21.602,14.359) 25.662,14.359 26.157,14.854 30.325,14.854 33.137,14.854 35.263,14.854 37.994,12.123 37.994,10.696 36.66,9.362 36.66,8.03 37.486,7.205 v1(37.523,7.205)
  BOTTOM w0.15: v1(37.523,7.205) 40.939,7.205 TP_SWDIO.X@41.803,6.341
TX: JP3.1 U1.2 | length 17.9
  TOP w0.15: U1.2@26.179,7.966 26.863,7.966 27.082,8.186 28.272,8.186 v1(28.73,7.728)
  BOTTOM w0.15: v1(28.73,7.728) 29.26,7.728 30.037,8.505 31.334,8.505 32.624,9.795 32.624,10.466 34.139,11.981 34.344,11.981 35.194,12.832 35.194,13.397 38.362,16.565 39.285,16.565 JP3.1@39.349,16.501
USB_N: D1.3 D-.X J1.2 R4.1 | length 12.2
  TOP w0.21: v1(3.004,9.566) 3.022,9.549 3.817,9.549 J1.2@3.834,9.531 4.509,9.531 4.731,9.31 5.515,9.31 7.019,9.31 7.142,9.433 D1.3@7.142,10.161 ; D1.3@7.172,10.191 7.187,10.176 8.289,10.176 R4.1@8.304,10.191
  BOTTOM w0.3: D-.X@1.772,14.342 1.772,12.934 2.572,12.134 2.572,10.932 2.221,10.581 2.221,9.642 2.397,9.466 2.877,9.466 2.977,9.566 v1(3.004,9.566)
USB_P: D1.2 D+.X J1.3 R5.1 | length 10
  TOP w0.21: v1(3.004,8.866) 3.012,8.874 J1.3@3.834,8.874 ; J1.3@3.834,8.881 4.622,8.881 4.69,8.95 5.365,8.95 7.019,8.95 7.142,8.827 D1.2@7.142,8.251 ; D1.2@7.202,8.191 7.232,8.221 8.274,8.221 R5.1@8.304,8.191
  BOTTOM w0.3: D+.X@1.772,11.802 1.906,11.669 1.906,11.332 1.962,11.277 1.962,11.028 1.721,10.788 1.721,9.435 2.19,8.966 2.877,8.966 2.977,8.866 v1(3.004,8.866)
VIN: C4.2 C23.2 C25.2 D2.C JP2.15 U6.2 U6.3 | length 45.1
  TOP w0.24: C4.2@12.058,3.828 12.108,3.828 12.731,4.451 ; U6.3@13.263,4.451 12.731,4.451 ; U6.2@13.263,4.951 12.872,4.951 12.731,4.811 12.731,4.451
  TOP w0.4: v1(8.509,3.811) D2.C@9.369,3.811 9.378,3.82 10.699,3.82 C23.2@10.708,3.828 C4.2@12.058,3.828 ; JP2.15@39.349,1.261 40.891,2.803 40.891,3.357 v1(40.889,3.36) 40.859,3.33 C25.2@40.274,3.33
  SIG w0.4: v1(8.509,3.811) 9.279,3.041 16.107,3.041 16.276,2.872 21.383,2.872 v1(21.411,2.9)
  BOTTOM w0.4: v1(21.411,2.9) 21.418,2.893 22.222,2.893 22.224,2.894 25.269,2.894 25.866,3.491 26.924,3.491 28.974,5.541 30.684,5.541 31.422,6.279 32.992,6.279 33.201,6.487 33.74,6.487 33.995,6.232 34.299,6.232 34.312,6.219 34.331,6.219 34.643,5.907 34.643,5.602 36.884,3.36 v1(40.889,3.36) v1(40.889,3.36)
VUSB: D1.4 D2.A J1.1 SJ1.1 | length 37.4
  TOP w0.3: J1.1@3.834,10.181 3.844,10.171 5.432,10.171 5.62,9.984 6.011,9.984 v1(6.03,9.964) ; D2.A@6.099,3.811 6.137,3.774 6.88,3.774 v1(6.899,3.755)
  SIG w0.3: v1(6.899,3.755) 8.115,2.539 15.903,2.539 16.069,2.372 22.041,2.372 22.632,2.963 28.602,2.963 29.349,3.71 29.349,4.158 29.196,4.31 29.196,4.386 v1(29.177,4.405)
  BOTTOM w0.3: v1(29.177,4.405) 29.513,4.741 31.038,4.741 31.329,5.032 SJ1.1@32.252,5.032
  BOTTOM w0.6: v1(6.03,9.964) 6.899,9.096 v1(6.899,3.755)
pads on no net: Fiducial_2.1 J1.4 JP2.3 U1.21 U2.5 U2.11 U2.15 U2.20 U2.24 U2.25 U2.32 U2.33 U4.1 U4.2 U4.3 U4.7 U4.9 U6.6 U9.9 U9.10 U9.11

## Polygon pours and split planes (outlines as drawn)
no net on Top Overlay "GND_SILK" (solid): 30.444,17.771 30.444,14.871 32.944,14.871 32.944,17.771 32.541,17.771 32.541,16.471 cw(c31.752,16.479) 31.745,15.69 cw(c31.722,16.494) 30.917,16.471 30.917,17.771
no net on Top Overlay "GND_SILK" (solid): 38.094,-0.009 38.094,2.891 35.594,2.891 35.594,-0.009 35.997,-0.009 35.997,1.291 cw(c36.787,1.284) 36.794,2.073 cw(c36.817,1.269) 37.621,1.291 37.621,-0.009
GND on TOP "GND_TOP" (solid, remove dead copper, pour order 1): -0.006,-0.009 -0.006,17.771 43.174,17.771 43.174,-0.009
GND on GND "GND_2" (solid, remove dead copper, pour order 0): -0.006,17.771 -0.006,-0.009 43.174,-0.009 43.174,17.771
GND on BOTTOM "GND_BOT" (solid, remove dead copper, pour order 4): -0.006,-0.009 -0.006,17.771 43.174,17.771 43.174,-0.009
+3V3 on SIG "PWR" (solid, remove dead copper, pour order 3): -0.006,-0.009 -0.006,17.771 43.174,17.771 43.174,-0.009

## Keep-outs
SIG:
  region: 9.804,9.866 8.404,9.866 8.404,8.5 9.501,8.5 11.27,6.73 12.782,6.73 14.171,5.342 22.22,5.342 22.22,6.39 21.219,6.39 14.816,6.39 13.429,7.828 11.843,7.828

## Other copper
TOP:
  pour cut-out: 12.537,15 12.537,11.9 8.1,11.9 8.1,15
  pour cut-out: 43.156,4.129 39.346,4.129 39.346,13.624 43.156,13.624
GND:
  pour cut-out: 43.156,4.129 39.346,4.129 39.346,13.624 43.156,13.624
SIG:
  pour cut-out: 43.156,4.129 39.346,4.129 39.346,13.624 43.156,13.624
BOTTOM:
  pour cut-out: 15.015,6.865 14.9,6.75 14.9,5.255 17.105,5.255 17.2,5.35 17.2,6.865
  pour cut-out: 32.254,4.826 31.384,4.826 31.384,3.332 32.252,3.332
  pour cut-out: 40.094,15.891 40.894,15.891 40.894,17.491 40.094,17.491
  pour cut-out: 43.156,4.129 39.346,4.129 39.346,13.624 43.156,13.624
  text "..." at 40.694,16.091 h0.4 r90

## Silkscreen, mask and mechanical layers (free items; w line width, h text height)
Top Overlay:
  drawing of 14 lines, arcs and shapes, not listed
  text "." at 28.64,15.187 h0.1 r90
  text "." at 17.882,14.43 h0.1 r90
  text "." at 8.105,11.725 h0.1 r90
  text "." at 26.468,6.424 h0.1 r90
  text "." at 28.81,6.216 h0.1 r90
  text "." at 12.89,5.937 h0.1 r90
  text "." at 26.267,2.881 h0.1 r90
Bottom Overlay:
  drawing of 235 lines, arcs and shapes, not listed
Top 3D Body:
  the board outline again, w0.01
Route Tool Path:
  lines w2: -1.006,0.991 -1.006,-0.009 ccw(c-0.006,-0.009) -0.006,-1.009 43.174,-1.009 ccw(c43.174,-0.009) 44.174,-0.009 44.174,6.491 ; -1.006,4.991 -1.006,12.991 ; -1.006,16.991 -1.006,17.771 cw(c-0.006,17.771) -0.006,18.771 43.174,18.771 cw(c43.174,17.771) 44.174,17.771 44.174,10.491
Board:
  the board outline again, w0.1